# Altium PCB Master-PCB.PcbDoc (part 3 of 3)
Units mil, origin at the board's own origin, x right, y up, seen from the top; angles counter-clockwise.
Board outline 3149.61 x 2348 mil, 2 copper layers (Top Layer, Bottom Layer), stack 57 mil thick; 132 components, 59 nets, 410 pads, 547 vias.
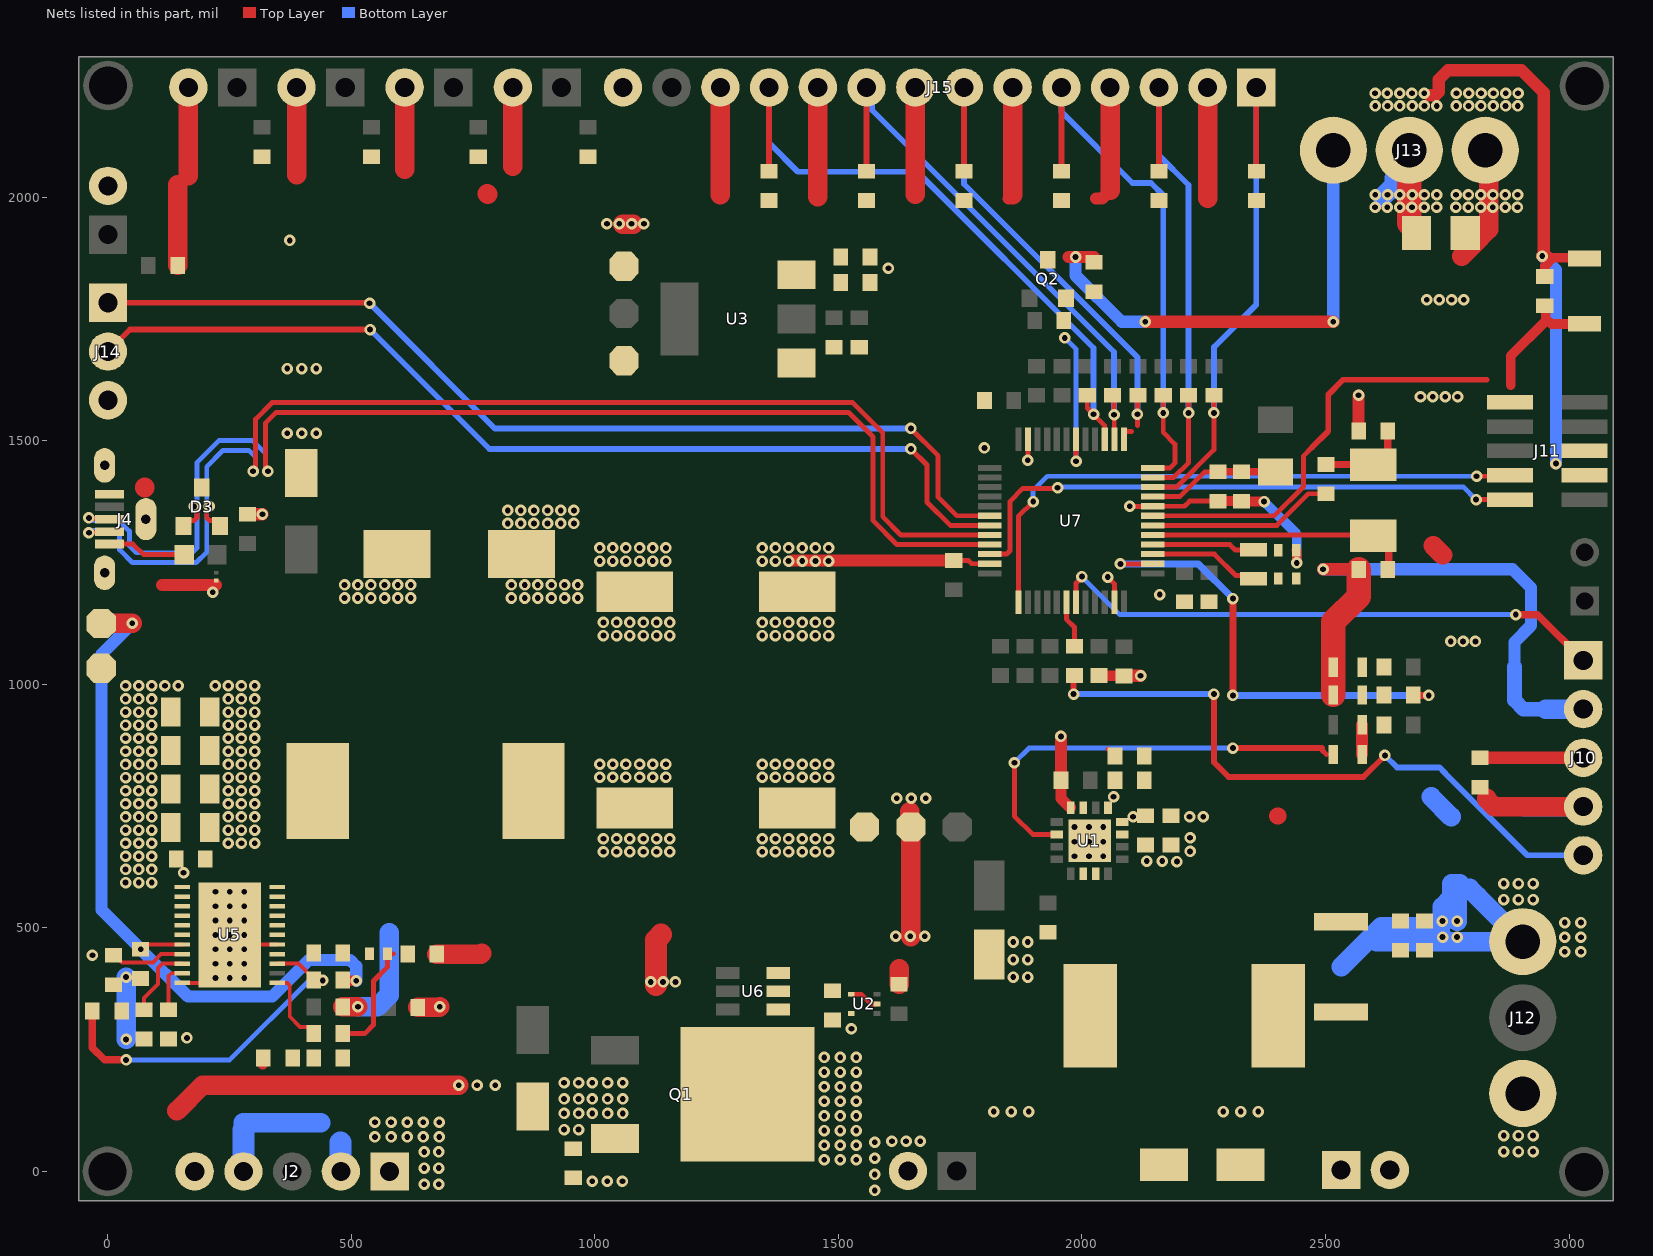
[diagram p2: the nets of this part, all layers, seen from the top]

## Via types
v1: diameter 23.62, hole 11.81, Top Layer to Bottom Layer, 545 vias
v2: diameter 23.62, hole 11.81, Top Layer to Bottom Layer, tented both sides, 2 vias

## Nets (pads, with @x,y where several pads share a name; then routed paths per layer and width w, separated by ;. In a path a pad name is that pad's centre, name@x,y a point inside that pad or via, vN(x,y) a via of type N, cw(c..) or ccw(c..) an arc to the next point about the centre after c; other vN are vias at no path point) (continued)
GND: C1.2 C2.1 C3.1 C4.1 C5.1 C6.1 C7.1 C8.1 C9.1 C10.1 C11.1 C12.1 C13.1 C14.1 C15.1 C16.1 C17.1 C18.1 C19.1 C20.1 C21.1 C22.1 C23.2 C24.2 C25.1 C26.1 C27.1 C28.1 C29.1 C30.2 C31.1 C32.2 C33.1 C36.2 C37.2 C38.1 C40.1 C41.1 C42.1 C43.1 C44.1 C45.1 C46.1 C47.1 C48.1 C49.2 C50.2 C51.2 C52.2 C53.2 C54.2 D1.2 D3.3 D4.2 J1.2 J2.5 J3.2 J4.5 J4.SH1 J4.SH2 J4.SH3 J5.2 J6.2 J7.2 J8.2 J9.2 J10.2 J11.3 J11.5 J12.1 J13.2 J14.3 J15.2 J15.4 J15.6 J15.8 J15.10 J15.12 LED3.2 LED4.2 P9.1 R9.2 R14.1 R17.1 R19.2 R31.1 SW1.2 U1.7 U1.11 U1.12 U1.17 U2.2 U2.4 U3.1 U5. U5.5 U5.22 U5.23 U6.2 U6.3 U7.8 U7.23 U7.35 U7.47 | length 7375.2
  Top Layer w8: U5.22@153.56,387.1 U5.23@207.94,387.1 ; U5.23@294.06,465.84 U5.5@348.44,465.84
  Top Layer w10: U5.23@272.53,454.93 276.21,454.93 U5.23@286.06,464.77 ; U2.4@1526.43,363.68 1547.32,363.68 1567,344 U2.2@1579.57,344 ; C16.1@1726,1254 C16.1@1737,1254 1767,1254 1773.58,1247.42 U7.35@1810.68,1247.42 ; v1(1889,1460) 1889.21,1460.21 1889.21,1503.11 U7.23@1889.42,1503.32 ; v1(2053,1220) 2066.79,1206.21 2066.79,1168.89 U7.47@2066.58,1168.68 ; v1(2098.26,1365.26) 2145.06,1365.26 U7.8@2145.32,1365.53 2210.53,1365.53 2221,1376 C14.1@2279,1376 ; C21.1@2328,1376 C21.1@2329,1375
  Top Layer w20: C14.1@2279,1376 C21.1@2328,1376 ; C21.1@2329,1375 v1(2374,1375) v1@2374.69,1375 ; C13.1@2440,1275 2441,1274 v1(2441,1249) ; v1(2945,1879) 2957,1879 2960.28,1875.72 3032,1875.72 3033.86,1873.86 SW1.2@3032,1873.86 ; C22.1@2950,1837 2950,1859 2965,1874 ; v1(2973,1453) v1@2974,1453 ; SW1.2@3006.07,1874 SW1.2@3031.86,1874
  Top Layer w22: R14.1@318,221 R14.1@318.69,220.31 ; C5.1@1957,803 1957,765.53 1975.63,746.89 U1.12@1976.96,746.89 ; R9.2@2035.4,1018 2035.9,1017.5 2085.5,1017.5 C15.1@2086,1017
  Top Layer w25: 112,1204 223,1204 ; C42.1@287,1349 v1(318,1349) ; 388,2046 390,2044 ; 610,2057 612,2055 ; 1254,2001 1258,2005 ; v1@1406.86,1254 C16.1@1726,1254 ; 1457,2000 1458,2001 ; 1850,1997 1858,2005 ; C5.1@1957,803 v1(1957,893) ; 2029,1997 2041.5,1997 2058,2013.5 ; C15.1@2086.37,1017.37 v1(2120.37,1017.37) ; C19.1@2210.77,1168.77 C19.1@2211,1169 ; 2258,1998 2259,1997 ; v1(2495,1236) C23.2@2568,1236 ; C24.2@2568,1520 v1(2568,1593) ; 2714,2209 2726,2209 2732.5,2215.5 2732.5,2241.5 2751.35,2260.35 2902.23,2260.35 2948,2214.58 2948,1882 v1(2945,1879)
  Top Layer w40: 76,1404 76.26,1403.74 ; 142.5,124.5 195,177 v1(721,177) ; C47.1@144,1860 144,2025 ; 166,2044 J8.2@166,2225 J8.2@166,2227 ; 388,2046 J7.2@388,2225 J7.2@388,2227 ; 610,2057 J6.2@610,2225 J6.2@610,2227 ; R31.1@637,337 681,337 v1(682,338) ; 779,2007 780,2006 ; 832,2063.35 J5.2@832,2225 J5.2@832,2227 ; 1258,2005 J15.12@1258,2225 ; 1458,2001 J15.10@1458,2225 ; C41.1@1625,384 1625,416 ; 1658,2006 J15.8@1658,2225 ; 1858,2005 J15.6@1858,2225 ; 2058,2013.5 J15.4@2058,2225 ; 2258,1998 J15.2@2258,2225
  Top Layer w50: LED4.2@2516,978 LED3.2@2516,1035 2516,1128 2568,1180 C23.2@2568,1236 ; J13.2@2672,2096 2672,1946 2687,1931 C38.1@2687,1926
  Bottom Layer w20: v1@2374.69,1374.31 2441,1308 v1(2441,1249)
  Bottom Layer w25: v1(2495,1236) 2884,1236 2922,1198 2922,1120.4 2888,1086.4 2888,1036 ; v1(2945,1879) 2973,1851 v1(2973,1453)
  Bottom Layer w30: 2888,1036 2888,967 2906,949 2952,949
  Bottom Layer w40: v1(38,271) v1(38,399) ; v1@2617,2000 2641.36,2024.36 2641.36,2038.89 2672,2069.54 J13.2@2672,2096 ; 2952,949 J10.2@3029,949
  other v1: 1575,-39 995,-20 1026,-20 1057,-20 1575,-6 1575,27 2866,40.81 2896,40.81 2926,40.81 1575,60 1610,62 1639,62 1668,62 2866,73.81 2896,73.81 2926,73.81 1819,123 1855,123 1891,123 2290,123 2326,123 2362,123 758.5,177 796,177 163,274 1859,399 1889,399 1859,435 1889,435 1859,471 1889,471 2195,636 2133,637 2165,637 1985,647 2014.5,647 2044,647 1344,656.07 1371,656.07 1398,656.07 1426,656.07 1453,656.07 1480,656.07 2222,657 248,673.79 275,673.79 302,673.79 1985,677 2014.5,677 2044,677 1344,683 1371,683 1398,683 1426,683 1453,683 1480,683 2222,685 248,700.71 275,700.71 302,700.71 1985,707 2014.5,707 2044,707 248,727.64 275,727.64 302,727.64 248,754.57 275,754.57 302,754.57 248,781.5 275,781.5 302,781.5 248,808.43 275,808.43 302,808.43 1344,809 1371,809 1398,809 1426,809 1453,809 1480,809 248,835.36 275,835.36 302,835.36 1344,835.93 1371,835.93 1398,835.93 1426,835.93 1453,835.93 1480,835.93 248,862.28 275,862.28 302,862.28 248,889.21 275,889.21 302,889.21 248,916.14 275,916.14 302,916.14 248,943.07 275,943.07 302,943.07 248,970 275,970 302,970 221,996.93 248,996.93 275,996.93 302,996.93 1344,1100.07 1371,1100.07 1398,1100.07 1426,1100.07 1453,1100.07 1480,1100.07 1344,1127 1371,1127 1398,1127 1426,1127 1453,1127 1480,1127 486.67,1177.07 513.67,1177.07 540.67,1177.07 568.67,1177.07 595.67,1177.07 622.67,1177.07 2160,1184 216,1188.93 486.67,1204 513.67,1204 540.67,1204 568.67,1204 595.67,1204 622.67,1204 1344,1253 1371,1253 1398,1253 1426,1253 1453,1253 1480,1253 1344,1279.93 1371,1279.93 1398,1279.93 1426,1279.93 1453,1279.93 1480,1279.93 1800,1485 1603,1854 374,1911 2601.67,1979 2626.93,1979 2652.2,1979 2677.47,1979 2702.73,1979 2728,1979 2602.09,2005 2627.36,2005 2652.63,2005 2677.89,2005 2703.16,2005 2728.43,2005 2602.09,2187 2627.36,2187 2652.63,2187 2677.89,2187 2703.16,2187 2728.43,2187 2601.67,2213 2626.93,2213 2652.2,2213 2677.47,2213 2702.73,2213
HV_LED_DATA: J13.3 Q2.3 R8.1 | length 1011.1
  Top Layer w25: 1972.5,1877 v1(1986.9,1877) R8.1@2025,1877 ; v1(2130.24,1744) v1(2516.09,1744)
  Bottom Layer w25: v1(1986.9,1877) 1986.9,1838.82 2081.72,1744 v1(2130.24,1744) ; v1(2516.09,1744) J13.3@2516.09,2096
I/O1: C49.1 J15.1 R15.2 U7.10 | length 1148.2
  Top Layer w10: U7.10@2145.32,1404.9 2194.9,1404.9 2271,1481 R15.2@2271,1592
  Top Layer w12: C49.1@2358,2049 J15.1@2358,2225
  Bottom Layer w12: v1(2271,1557) 2271,1692 2358,1779 J15.1@2358,2225
I/O2: C50.1 J15.3 R16.2 U7.11 | length 1080.5
  Top Layer w10: U7.11@2145.32,1424.58 2188.58,1424.58 2219,1455 v1(2219,1557) R16.2@2219,1584
  Top Layer w12: C50.1@2158,2053 J15.3@2158,2225
  Bottom Layer w12: J15.3@2158,2225 2158,2086 2219,2025 v1(2219,1557)
I/O3: C51.1 J15.5 R25.2 U7.12 | length 1146.5
  Top Layer w10: U7.12@2145.32,1444.27 2181.27,1444.27 2191,1454 2191,1493 2167,1517 v1(2167,1557) R25.2@2167,1592
  Top Layer w12: C51.1@1958,2053 J15.5@1958,2225
  Bottom Layer w12: J15.5@1958,2225 1958,2175 2104,2029 2142,2029 2167,2004 v1(2167,1557)
I/O4: C52.1 J15.7 R27.2 U7.13 | length 1082.9
  Top Layer w10: U7.13@2086.27,1503.32 2086.27,1517.46 2087.57,1518.76 2101.71,1518.76 ; 2114,1531.05 v1(2114,1554) 2114,1592 R27.2@2115,1593
  Top Layer w12: C52.1@1758,2053 J15.7@1758,2225
  Bottom Layer w12: J15.7@1758,2225 1758,2027 2114,1671 v1(2114,1554)
I/O5: C53.1 J15.9 R28.2 U7.14 | length 1145.6
  Top Layer w10: R28.2@2063,1593 2066,1590 v1(2066,1553) 2066.29,1552.71 2066.29,1503.61 U7.14@2066.58,1503.32
  Top Layer w12: C53.1@1558,2053 J15.9@1558,2225
  Bottom Layer w12: J15.9@1558,2225 1569.07,2213.93 1569.07,2178.93 2066,1682 v1(2066,1553)
I/O6: C54.1 J15.11 R29.2 U7.15 | length 1355.1
  Top Layer w10: R29.2@2011,1593 2011,1567 2047,1531 U7.15@2047,1517 ; U7.15@2045.6,1504.62 U7.15@2046.9,1503.32
  Top Layer w12: C54.1@1358,2053 J15.11@1358,2225
  Bottom Layer w12: J15.11@1358,2225 1358,2111 1417,2052 1662,2052 2024,1690 v1(2024,1554)
LATCH: J10.1 U7.43 | length 1157.6
  Top Layer w10: U7.43@1987.84,1168.68 1987.84,1207.69 2000,1219.85 v1(2000,1221)
  Top Layer w15: v1(2890.69,1143) 2935,1143 J10.1@3029,1049
  Bottom Layer w10: v1(2000,1221) 2078,1143 v1(2890.69,1143)
LED_DATA: Q2.2 R7.1 U7.18 | length 307.9
  Top Layer w10: U7.18@1987.84,1503.32 1987.84,1458.16 v1(1988,1458)
  Bottom Layer w10: v1(1965,1711) 1988,1688 v1(1988,1458)
LED_LAT: J10.5 R26.1 | length 1340.5
  Top Layer w10: R26.1@1983,1016.2 R26.1@1984.8,1018
  Top Layer w12: v1(1983,980) R26.1@1983,1016.2 ; v1(2271,980) 2271,840 2301,810 2578,810 v1(2622,854)
  Bottom Layer w12: v1(1983,980) v1(2271,980) ; v1(2622,854) 2647,829 2734.27,829 2745,818.27 2745,818 2914,649 J10.5@3029,649
LL: C34.1 L2.1 R3.1 U5.6 U5.7 U5.8 U5.9 U5.10 U5.11
LX: D1.1 L1.1 U1.2 U1.3
MCU_SWCLK: J11.4 U7.37 | length 1233.2
  Top Layer w10: U7.37@1869.73,1168.68 1869.73,1344.73 v1(1900,1375) ; v2(2810,1427) 2876.46,1427 J11.4@2878.46,1429
  Bottom Layer w10: v1(1900,1375) 1900,1398 1929,1427 v2(2810,1427)
MCU_SWDIO: J11.2 U7.34 | length 1194.5
  Top Layer w10: U7.34@1810.68,1267.1 1845.18,1267.1 1852.73,1274.66 1852.73,1375.73 1879,1402 1948.81,1402 v1(1950,1403.19) ; v2(2809,1379) J11.2@2878.46,1379
  Bottom Layer w10: v1(1950,1403.19) 1951.42,1404.61 2783.39,1404.61 v2(2809,1379)
MODE: R17.2 R18.1 U5.20 | length 167.7
  Top Layer w8: R17.2@75,332 75,356 104,385 104,418 112.47,426.47 U5.20@153.56,426.47
  Top Layer w10: R17.2@75,332 77.5,332 R17.2@87.5,342
NetC13_2: C13.2 U7.4 X1.1 | length 211.5
  Top Layer w10: U7.4@2145.32,1286.79 2303.66,1286.79 2315.22,1275.22 X1.1@2352,1275.22
NetC14_2: C14.2 C21.2 FB1.2 U7.9 | length 272.7
  Top Layer w10: U7.9@2145.32,1385.21 2201.21,1385.21 2252,1436 C14.2@2279,1436
  Top Layer w15: C14.2@2279,1436 C21.2@2328,1436 FB1.2@2397,1436
NetC18_2: C18.2 U7.3 X1.2 | length 227.5
  Top Layer w10: U7.3@2145.32,1267.1 2271.9,1267.1 2315.75,1223.25 2345.7,1223.25 X1.2@2352,1216.94
NetC23_1: C23.1 U7.5 X2.2 | length 502.3
  Top Layer w10: U7.5@2145.32,1306.47 2596.53,1306.47 X2.2@2598,1305
  Top Layer w15: C23.1@2630,1236 X2.2@2630,1285
NetC24_1: C24.1 R30.2 X2.1 | length 180.2
  Top Layer w12: X2.1@2598,1450.67 2600.54,1450.67 X2.1@2628,1478.13
  Top Layer w15: R30.2@2501,1451 X2.1@2598,1451 ; X2.1@2628,1478.13 C24.1@2628,1520
NetC34_2: C34.2 U5.4
NetC35_2: C35.2 C55.1 R3.2 | length 240.5
  Top Layer w10: C55.1@483,283 528,283 546,301 546,391 574.5,419.5 R3.2@574.5,447 ; R3.2@577.5,440.5 584,447 587,447
NetF1_1: F1.1 J4.1 | length 162.6
  Top Layer w10: J4.1@4,1287.82 52.18,1287.82 74,1266 F1.1@157.54,1266
NetJ10_3: J10.3 R5.1 | length 212
  Top Layer w25: R5.1@2817,849 J10.3@3029,849
NetLED1_1: LED1.1 LED2.1 R2.2 | length 62.4
  Top Layer w20: LED1.1@2575.06,917 LED1.1@2575.21,916.84 ; R2.2@2619.16,916.84 R2.2@2620,916
  Top Layer w25: LED2.1@2575.06,856 LED1.1@2575.06,917
NetLED3_1: LED3.1 R6.1
NetLED4_1: LED4.1 R10.1
NetR19_1: R19.1 U5.21 | length 99.9
  Top Layer w8: R19.1@125,332 125,400.93 130.86,406.79 U5.21@153.56,406.79
NetR30_1: R30.1 U7.6 | length 382.5
  Top Layer w10: U7.6@2145.32,1326.16 2400.16,1326.16 2465,1391 R30.1@2501,1391
NRST: C22.2 J11.10 SW1.1 U7.7 | length 1156.5
  Top Layer w10: U7.7@2145.32,1345.84 2394.84,1345.84 2455,1406 2455,1469 2472,1486
  Top Layer w12: 2472,1486 2505.5,1519.5 2505.5,1594.5 2536,1625 2831,1625
  Top Layer w20: J11.10@2878.46,1579 J11.10@2880.26,1580.8 ; 2880,1614 2880,1674 2950,1744 ; C22.2@2950,1777 2952,1775 2952,1751 2963.72,1739.28 3029.29,1739.28 3030.29,1738.29 SW1.1@3032,1740
PB6: R26.2 U7.42 | length 97.6
  Top Layer w10: U7.42@1968.16,1168.68 1968.16,1133.84 1984.8,1117.2 R26.2@1984.8,1078
PGOOD: R12.2 R18.2 U5.3 | length 735.2
  Top Layer w8: U5.3@348.44,426.47 392.03,426.47 R12.2@423,395.5
  Top Layer w10: R12.2@423,393 R12.2@423,395.5
  Top Layer w15: R18.2@-31,329 -31,254 -6,229 v1(38,229)
  Top Layer w22: R12.2@423,393 423.69,392.31 441.69,392.31 v1(442,392)
  Bottom Layer w10: v1(38,229) 251,229 414,392 v1(442,392)
RX: J14.2 U7.31 | length 2039.3
  Top Layer w10: v1(1649,1483) 1682,1450 1682,1374 1729.84,1326.16 U7.31@1810.68,1326.16
  Top Layer w12: J14.2@1,1683 46,1728 v1(539,1728)
  Bottom Layer w12: v1(539,1728) 784,1483 v1(1649,1483)
S\T\D\B\Y\: LED2.2 U1.14 | length 868.8
  Top Layer w10: v1(1861.5,839) 1861.5,729.5 1899.22,691.78 U1.14@1948.09,691.78 ; 2492.76,865 2502.26,855.5
  Top Layer w12: v1(2310,869) 2492.76,869
  Bottom Layer w10: v1(1861.5,839) 1891.5,869 v1(2310,869)
TEST: R10.2 U7.2 | length 960.3
  Top Layer w10: v1(2079,1247) 2079.21,1247.21 2145.11,1247.21 U7.2@2145.32,1247.42 ; R10.2@2680,978 R10.2@2681,977
  Top Layer w15: v1(2310,977) v1(2310,1176) ; R10.2@2681,977 v1(2712,977)
  Bottom Layer w15: v1(2079,1247) 2239,1247 v1(2310,1176) ; v1(2310,977) v1(2712,977)
TX: J14.1 U7.30 | length 2040.5
  Top Layer w10: v1(1649,1525) 1705,1469 1705,1384 1743.16,1345.84 U7.30@1810.68,1345.84
  Top Layer w12: J14.1@1,1783 537,1783 v1(538,1782)
  Bottom Layer w12: v1(538,1782) 795,1525 v1(1649,1525)
USB_D_N: D3.2 J4.2 U7.32 | length 2575.1
  Top Layer w10: v1(-38,1310.89) -36.74,1312.15 2.74,1312.15 J4.2@4,1313.41 ; v1(208.91,1365) 203.6,1359.69 203.6,1341.85 209.46,1335.99 220.01,1335.99 D3.2@231,1325 ; v1(298.69,1437) 298.69,1440.69 304,1446 304,1544.28 337.72,1578 1529.28,1578 1591.21,1516.07 1591.21,1343.86 1628.6,1306.47 U7.32@1810.68,1306.47
  Bottom Layer w10: v1(-38,1310.89) -34.31,1310.89 -29,1316.2 15,1316.2 25,1306.2 25,1275.72 50.72,1250 182.28,1250 203.6,1271.31 203.6,1356 208.91,1361.31 v1(208.91,1365) 208.91,1368.69 203.6,1374 203.6,1446.6 237,1480 290,1480 304,1466 304,1445 298.69,1439.69 v1(298.69,1437)
USB_D_P: D3.1 J4.3 U7.33 | length 2574.6
  Top Layer w10: v1(-38,1341.52) -36.74,1340.26 2.74,1340.26 J4.3@4,1339 ; D3.1@156.2,1325 167.19,1335.99 177.74,1335.99 183.6,1341.85 183.6,1359.62 v1(178.29,1364.93) ; v1(329.31,1437) 329.31,1440.69 324,1446 324,1536 346,1558 1521,1558 1571.21,1507.79 1571.21,1343.86 1571.53,1343.54 1571.53,1335.7 1620.44,1286.79 U7.33@1810.68,1286.79
  Bottom Layer w10: v1(-38,1341.52) -34.31,1341.52 -29,1336.2 23.28,1336.2 45,1314.49 45,1284 59,1270 174,1270 183.6,1279.6 183.6,1355.93 178.29,1361.24 v1(178.29,1364.93) 178.29,1368.62 183.6,1373.93 183.6,1454.88 228.72,1500 298.28,1500 324,1474.28 324,1445 329.31,1439.69 v1(329.31,1437)
VBAT: C6.2 C7.2 C8.2 C31.2 C40.2 J3.1 J12.3 P2.1 Q1.3 R1.2 U1.9 U2.5 U6.1 | length 1196.4
  Top Layer w10: C7.2@2053.74,866.74 C7.2@2054,867
  Top Layer w40: 1647,738 1647,709 P2.1@1649,707 v1@1649,482
  Bottom Layer w40: 2532,420 2594.31,482.31 2614,502 2736.5,502 ; 2604.81,471.81 v1@2740.4,471.81 ; 2717,769 2758,728 ; v1(2740,514) 2740,543 2759,562 2759,591 2776,591 ; v1(2740.4,481.22) v1@2740.4,471.81 ; v1(2770,514) 2770,591 ; 2795.91,580.91 2812.41,564.41 J12.3@2905,471.81 2770,471.81 v1@2740.4,471.81
  other v1: 1471,24 1504,24 1537,24 1471,54 1504,54 1537,54 1471,84 1504,84 1537,84 1471,114 1504,114 1537,114 1471,144 1504,144 1537,144 1471,174 1504,174 1537,174 1471,204 1504,204 1537,204 1471,234 1504,234 1537,234 1527,293 2991.19,450.81 3024.19,450.81 2770,481 2991.19,480.81 3024.19,480.81 1618,483 1647.83,483 1677.67,483 2991.19,510.81 3024.19,510.81 2866,558 2896,558 2926,558 2866,591 2896,591 2926,591 1620,766 1649.83,766 1679.67,766 2065,769
VCC: C25.2 C26.2 C27.2 C28.2 C29.2 C33.2 J2.2 J2.4 P5.1 R11.1 U5.12 U5.13 U5.14 U5.15 U5.16 U5.17 U5.19 | length 712.4
  Top Layer w8: C33.2@12.5,443.5 15,443.5 29.5,429 93,429 110.16,446.16 U5.19@153.56,446.16
  Top Layer w40: R11.1@483,338 v1(514,338)
  Bottom Layer w40: 279,85 294,100 ; 279,100 294,100 ; 438,100 294,100 ; J2.2@478.23,0.77 J2.2@479,0 ; v1(514,338) 553.85,338 577.93,362.07 577.93,490.15
  Bottom Layer w45: J2.4@279,0 279,85 ; J2.2@478.23,0.77 478.23,59.77
  other v1: -31,444 37,593 64,593 91,593 156,613 37,619.93 64,619.93 91,619.93 37,646.86 64,646.86 91,646.86 37,673.79 64,673.79 91,673.79 37,700.71 64,700.71 91,700.71 37,727.64 64,727.64 91,727.64 37,754.57 64,754.57 91,754.57 37,781.5 64,781.5 91,781.5 37,808.43 64,808.43 91,808.43 37,835.36 64,835.36 91,835.36 37,862.28 64,862.28 91,862.28 37,889.21 64,889.21 91,889.21 37,916.14 64,916.14 91,916.14 37,943.07 64,943.07 91,943.07 37,970 64,970 91,970 37,996.93 64,996.93 91,996.93 118,996.93 145,996.93
VCC#: C48.2 D2.1 J2.1 P4.1 Q1.2 | length 107.3
  Top Layer w45: 1126,383 1126,475.5 1136.5,486
  other v1: 650,-26 680,-26 650,7 680,7 650,40 680,40 549,71 582,71 615,71 648,71 681,71 937,86 967,86 549,101 582,101 615,101 648,101 681,101 937,119 967,119 995,119 1026.33,119 1057.67,119 937,149 967,149 995,149 1026.33,149 1057.67,149 937,182 967,182 995,182 1026.33,182 1057.67,182 1115,389 1140.33,389 1165.67,389
VCC_5V: C9.2 C10.2 C30.1 C35.1 C36.1 C37.1 C38.2 D5.1 J10.4 J13.1 J15.14 L2.2 P8.1 R5.2 R8.2 R13.1 U3.3 | length 756.3
  Top Layer w40: D5.1@397,1432.74 D5.1@398,1433.74 ; C35.1@676,446 766,446 768,448 ; v1@1058,1944 v1@1079,1944 ; 2720.97,1284.84 2740.47,1265.34 ; 2780,1879 2834.91,1933.91 ; C38.2@2804.5,1903.5 2834.91,1933.91 ; 2831,766.5 2831,764 2846,749 J10.4@3029,749 ; J13.1@2834.91,2099 2834.91,1933.91
  Bottom Layer w40: 2908,749 J10.4@3029,749
  other v1: 1018,656.07 1045,656.07 1072,656.07 1100,656.07 1127,656.07 1154,656.07 1018,683 1045,683 1072,683 1100,683 1127,683 1154,683 1010.14,809 1037.14,809 1064.14,809 1092.14,809 1119.14,809 1146.14,809 1010.14,835.93 1037.14,835.93 1064.14,835.93 1092.14,835.93 1119.14,835.93 1146.14,835.93 2757,1088 2782.33,1088 2807.67,1088 1018,1100.07 1045,1100.07 1072,1100.07 1100,1100.07 1127,1100.07 1154,1100.07 1018,1127 1045,1127 1072,1127 1100,1127 1127,1127 1154,1127 829.19,1177.07 856.19,1177.07 883.19,1177.07 911.19,1177.07 938.19,1177.07 965.19,1177.07 829.19,1204 856.19,1204 883.19,1204 911.19,1204 938.19,1204 965.19,1204 1010.14,1253 1037.14,1253 1064.14,1253 1092.14,1253 1119.14,1253 1146.14,1253 1010.14,1279.93 1037.14,1279.93 1064.14,1279.93 1092.14,1279.93 1119.14,1279.93 1146.14,1279.93 821.33,1330 848.33,1330 875.33,1330 903.33,1330 930.33,1330 957.33,1330 821.33,1356.93 848.33,1356.93 875.33,1356.93 903.33,1356.93 930.33,1356.93 957.33,1356.93 369,1515 398.83,1515 428.67,1515 2695,1590 2720.33,1590 2745.67,1590 2771,1590 369,1648 398.83,1648 428.67,1648 2708,1789 2733.33,1789 2758.67,1789 2784,1789 1025,1945 1050.33,1945 1075.67,1945 1101,1945 2767.67,1979 2792.93,1979 2818.2,1979 2843.47,1979 2868.73,1979 2894,1979 2768,2005 2793.27,2005 2818.53,2005 2843.8,2005 2869.07,2005 2894.33,2005 2768.48,2187 2793.74,2187 2819.01,2187 2844.28,2187 2869.54,2187 2894.81,2187 2768.81,2213 2794.08,2213 2819.34,2213 2844.61,2213 2869.88,2213 2895.14,2213
VFB: C55.2 R13.2 R14.2 U5.1 | length 156.7
  Top Layer w8: U5.1@348.44,387.1 348.81,386.73 369.31,386.73 374,382.04 374,318 395.5,296.5 412,296.5 423,285.5 C55.2@423,283
VREG: C32.1 P7.1 R12.1 U5.18 | length 1455.3
  Top Layer w8: C32.1@68,465.84 U5.18@153.56,465.84
  Top Layer w22: R12.1@483,393 484.69,391.31 v1(510.69,391.31)
  Top Layer w40: P7.1@-13,1125 v1(51,1125)
  Bottom Layer w22: v1@68,456.44 v1(68,456) v1@68.31,455.69
  Bottom Layer w25: v1(51,1125) -12,1062 -12,536.44 v1@68,456.44 ; v1@68.31,455.69 165,359 338,359 413,434 497.8,434 510.69,421.11 v1(510.69,391.31)
VS: C3.2 C4.2 L1.2 R1.1 U1.8 | length 1.2
  Top Layer w35: 2402,730 2402.83,729.17
  other v1: 2105,727.99 2221,728 2249,728
pads on no net: J2.3 J4.4 J11.6 J11.7 J11.8 J11.9 J12.2 U1.6 U2.3 U6.4 U7.16 U7.17 U7.21 U7.22 U7.25 U7.26 U7.27 U7.28 U7.29 U7.38 U7.45 U7.46

## Polygon pours and split planes (outlines as drawn)
GND on Top Layer "GND_L01_P000" (solid, remove dead copper, pour order 0): 41,34 2992,34 2992,2188 41,2188
GND on Bottom Layer "GND_L02_P001" (solid, remove dead copper, pour order 1): 41,34 2992,34 2992,2188 41,2188

## Other copper
Top Layer:
  rectangle net VCC_5V: 469,205 805,255
  rectangle net GND: 935,-32 987,5
  rectangle net VBAT: 1325,5 1547,346
  rectangle net VBAT: 1175,5 1499,296
  region net VCC_5V: 2179,1929.84 2060,1929.84 2060,1832.69 2179,1832.69
  rectangle net GND: 2189,1887 2671.41,2016
  region net VCC: 170,481 170,1071 -49,1071 -49,481
  region net GND: 96,1124 143,1171 45,1269 -2,1222
  rectangle net GND: 95,1124 198,1217
  rectangle net GND: -39,1181.52 46,1269
  region net NetC34_2: 331,454.3 331,438 423,438 423,454.3
  region net VS: 2448.88,212 2448.88,749 2311,749 2311,212
  region net GND: 1560,76 1560,-53.72 1684,-53.72 1684,76
  rectangle net 12V: 850,311 1298.54,346
  rectangle net NRST: 2925.01,1718.01 3067,1792.01
  region net GND: 2928,1921 2928,1813.85 3069,1813.85 3069,1921
  region net VBAT: 3041,534.15 2938.85,534.15 2938.85,401 3041,401
  rectangle net GND: 2595,1887 2745,2228
  rectangle net VFB: 405,209 442,305
  region net NetC35_2: 565,465 565,428 632,428 632,465
  rectangle net LL: 461,428 553,886
  rectangle net LX: 1999,57 2116,544
  region net VCC#: 1184,353 1184,516.24 1095,516.24 1095,353
  region net VCC#: 1594,453 1594,748 1515,748 1515,453
  rectangle net VCC#: 1095,450 1594,519
  rectangle net VBAT: 1606,461 1692,790
  region net GND: 1912,83 1912,163 1560,163 1560,83
  region net 12V: 1702,76 1702,-53.72 1861,-53.72 1861,76
  rectangle net GND: 1305,532 1498,1522
  rectangle net GND: 1550,1802 1616,1896
  rectangle net I/O4: 2080,1476 2121,1531
  region net NetC23_1: 2645,1312 2612,1312 2612,1215 2645,1215
  rectangle net NetC24_1: 2613,1444 2646,1541
  rectangle net VCC_5V: 2006,1771 2239,1840
  rectangle net NRST: 2821,1561 2944,1635
  rectangle net VCC_5V: 2794,703 3083,797.32
  rectangle net VCC_5V: 2681,1069 2826.78,1337
  rectangle net VCC_5V: 2681.47,1073 2783,1609
  region net VCC_5V: 2906,1771 2906,1877.85 2167,1877.85 2167,1771
  rectangle net VCC_5V: 2753,1833 2905,2230
  region net VCC_5V: 987,1595 987,1702 354,1702 354,1595
  rectangle net VCC_5V: 857,1597 988,1967
  rectangle net VCC_5V: 351,1366 448,1536
  rectangle net GND: 1022,1644 1102,1705
  rectangle net GND: 1022,1612 1662,1663
  rectangle net 3V3: 1194,1675 1342,1825
  rectangle net VCC_5V: 973,1817 1103.53,1864
  rectangle net 3V3: 1020,1720 1212,1802
  rectangle net VCC_5V: 1514,1903.05 2179,1966
  rectangle net VCC_5V: 887,1836 1385,1966
  region net GND: 711,197 711,157 825,157 825,197
  rectangle net S\T\D\B\Y\: 2476,832 2528.53,879
  rectangle net C\R\H\G\: 2476,893 2528.53,940
  rectangle net NetLED4_1: 2562,954 2635,1000
  rectangle net NetLED3_1: 2562,1011 2635,1056
  rectangle net GND: 113,1385 214,1423
  rectangle net BUCK_EN: 1604,324 1643,345
  rectangle net GND: 1372,1612 1822,1710
  rectangle net 3V3: 1133,1720 1853,1791
  rectangle net VCC_5V: 1374,1805 1524,1966
  region net GND: 1822,1635 1774,1635 1774,1463 1822,1463
  rectangle net GND: 466,1391 1497.69,1535
  rectangle net VCC_5V: 723,532 1184,1372
  rectangle net 12V: 1706,624 1782,738
  rectangle net GND: 466,1153 636,1512
  rectangle net GND: 263,1053 636,1217
  rectangle net 12V: 2655,663 2733,939.24
  rectangle net 12V: 838,217 955,451
  rectangle net LX: 1960,-36 2220,61
  rectangle net LX: 1961,-25 2075,427
  rectangle net GND: 2273,57 2662,143
  rectangle net LL: 332,480 550,886
  rectangle net GND: 186,377 313,1217
  rectangle net 3V3: 2068,1062 2136,1095
  rectangle net GND: 48,1300 123,1389
  rectangle net 5V_USB: 261,1225 451.45,1326
  rectangle net 5V_USB: 203,1225 423,1299
  rectangle net VCC: 462,318 486,358
  rectangle net 3V3: 2194,1214 2277,1244
  rectangle net GND: 2145,1146 2282,1200
  rectangle net 3V3: 2654,1015 2682,1055
  rectangle net GND: 2956,1413 3080,1496
  rectangle net 12V: 2659,913 2699,935
  rectangle net GND: 2112,617 2240,701
  rectangle net NetLED1_1: 2560,895 2639,939
  rectangle net 3V3: 1713,987 1761.5,1222
  rectangle net 3V3: 1713,975 1952.47,1038
  rectangle net 3V3: 1829,1545 1879,1821
  region net GND: 164,1836 164,1870 124,1870 124,1836
  region net GND: 2154,998 2154,1037 2016,1037 2016,998
  region net VCC_5V: 724,561 724,205 826,205 826,561
  rectangle net GND: 59,-41 226,290
  rectangle net BUCK_EN: 1572,248 1643,331
  region net GND: 2429,106 2273,106 2273,-35 2429,-35
  rectangle net GND: 1352,377 1919,443
  rectangle net GND: 186,155 315,436
  region net GND: 20,292 20,252 210,252 210,292
  region net GND: 123,1381 123,1627 -43,1627 -43,1381
  rectangle net GND: 2593,-45 2669,69
  region net GND: 337.43,254 297.43,254 297.43,155 337.43,155
  rectangle net GND: 1605,363 1645,398
  rectangle net VCC: -49,425 39,493
  rectangle net VREG: 48,440 88,474
  rectangle net GND: 1560,-38 1684,137
  rectangle net GND: 935,-54 1684,-6
  rectangle net VCC#: 539,-45 881,149
  rectangle net GND: -50,1975 2440,2026
  rectangle net GND: -50,1979 1010,2099
  rectangle net VCC#: 836,21 1128,197
  rectangle net BUCK_EN: 398,316 438,361
  rectangle net PGOOD: 408,375 456,412
  rectangle net VFB: 360,209 440,251
  rectangle net MODE: 13,311 94,348
  rectangle net GND: -7,365 39,394
  rectangle net GND: -7,383 86,414
  rectangle net 3V3: 1868,1623 2422,1686
  region net GND: 2456,1204 2456,1294 2423,1294 2423,1204
  rectangle net 3V3: 1866,1637 1921,1821
  rectangle net HV_LED_DATA: 1912,1849 2049,1891
  rectangle net LED_DATA: 1945.84,1697 1992.84,1822
  rectangle net NetC18_2: 2324,1203 2414,1236
  rectangle net NetC13_2: 2324,1261 2414,1294
  rectangle net GND: 2638,-45 2968,229
  rectangle net GND: 2635,88 2724,472
  rectangle net VBAT: 2792,400 2979,494
  rectangle net VBAT: 2472,485 2979,610
  rectangle net VS: 2349,212 2617,428
  rectangle net 12V: 2045,561 2096,624
  rectangle net 12V: 2068,561 2103,649
  rectangle net GND: 1969,635 2011,761
  rectangle net GND: 2108,775 2154,1035
  rectangle net VBAT: 2044,734 2062,787
  rectangle net VBAT: 2044,756 2084,878
  rectangle net VS: 2069,709 2431,749
  rectangle net GND: 2048,683 2235,700
  rectangle net GND: 1707,436 1959,511
  rectangle net 12V: 1957,534 1985,624
  rectangle net 12V: 1706,534 1961,649
  rectangle net GND: 1352,355 1538,423
  rectangle net LX: 1994,-14 2036,624
  pour cut-out: 1958,560 1958,76 2463,76 2463,560 2462,560
  pour cut-out: 358,536.48 942,536.48 942,1029.52 358,1029.52
Bottom Layer:
  region net VCC#: 1112,17 1112,302 918,302 918,17
  region net VBAT: 1693,509 1490,509 1490,280 1693,280
  rectangle net VCC#: 1034,257 1181,404
  region net GND: 2542,2024 2542,1887 2695,1887 2695,2024
  region net VCC_5V: 2905,2231 2755.85,2231 2755.85,1573 2905,1573
  rectangle net VS: 2087,714 2262,742
  region net GND: 1560,78 1560,-53.72 1684,-53.72 1684,78
  rectangle net GND: 1314,645 1499,1409.88
  rectangle net GND: 462,1154 649,1226
  rectangle net VCC: 133.15,593.15 622,653
  rectangle net GND: 205,661 319,1013
  region net VCC: -49,463 -49,64 11,64 11,463
  rectangle net VCC: 14,544.58 172,1012
  region net VBAT: 1947,779 1602,779 1602,695 1947,695
  region net VBAT: 2717,810 2271,810 2271,732 2717,732
  region net VBAT: 2845,699 2730.5,813.5 2682.5,765.5 2797,651
  region net GND: 2242,706 2114,706 2114,622 2242,622
  rectangle net 12V: 848,526 2457,613.16
  rectangle net 12V: 1516,571 1956.04,661
  rectangle net 12V: 848,535.5 2106,625.5
  rectangle net 12V: 2269,569 2457,659
  rectangle net 12V: 2661.83,851 2734,945
  rectangle net GND: 1965,633 2061,723
  region net VCC: 635,313.15 635,654 533.85,654 533.85,313.15
  region net VCC: 501,147 -43,147 -43,64 501,64
  rectangle net VBAT: 2953,400 3043,536
  rectangle net VBAT: 2497,400 2976,603
  region net VCC_5V: 449,1687 352,1687 352,1293.23 449,1293.23
  region net GND: 1917,486 1805,486 1805,107 1917,107
  region net VBAT: 2732,812.88 1601,812.88 1601,749 2732,749
  region net VBAT: 2844.88,547 2844.88,698.5 2764,698.5 2764,547
  region net VBAT: 2774.88,597 2774.88,748.5 2707,748.5 2707,597
  region net VBAT: 1490,512 1490,436 1693,436 1693,512
  region net 12V: 1702,78 1702,-53.72 1861,-53.72 1861,78
  rectangle net 3V3: 2945,1113 3073,1216
  rectangle net VCC_5V: 2880.44,703 3074.68,799
  region net VCC_5V: 2949.5,772.5 2811.5,910.5 2742.4,841.4 2880.4,703.4
  region net VCC_5V: 2845,1105 2741.54,1105 2741.54,840.68 2845,840.68
  region net VCC_5V: 2783,1870 2681,1870 2681,1573 2783,1573
  region net GND: 2746.91,2228 2595.91,2228 2595.91,1887 2746.91,1887
  rectangle net VCC_5V: 349,1293 1171,1406
  rectangle net VCC_5V: 1011,1924 1110,2274
  rectangle net VCC_5V: 733,639 1186.26,1406
  region net VBAT: 2473,603 2473,-41 2578,-41 2578,603
  region net 12V: 955,559.24 848.28,559.24 848.28,399 955,399
  region net 12V: 2269,724 2269,614 2699,614 2699,724
  region net GND: 2376,163 1804,163 1804,88 2376,88
  rectangle net GND: 198.19,382.35 296.78,585.77
  rectangle net VBAT: 1458,7 1551,246
  rectangle net VCC#: 536,-45 696,125.74
  region net GND: 1684,-3 706,-3 706,-53.72 1684,-53.72
  region net GND: 826,-48 826,197 707,197 707,-48
  rectangle net 12V: 1701,-40 1796,637

## Silkscreen, mask and mechanical layers (free items; w line width, h text height)
Top Overlay:
  text "5V" at 1078.28,2104 h60 r90
  text "I/01" at 2382.28,2088 h60 r90
  text "I/06" at 1382.28,2084 h60 r90
  text "I/05" at 1582.28,2084 h60 r90
  text "I/04" at 1782.28,2084 h60 r90
  text "I/03" at 1979.28,2084 h60 r90
  text "I/02" at 2180.28,2084 h60 r90
  text "3V3" at 1179.28,2076 h60 r90
  text "GND" at 627.28,2057 h60 r90
  text "GND" at 854.28,2057 h60 r90
  text "GND" at 1280.28,2057 h60 r90
  text "GND" at 1480.28,2057 h60 r90
  text "GND" at 1680.28,2057 h60 r90
  text "GND" at 1880.28,2057 h60 r90
  text "GND" at 2080.28,2057 h60 r90
  text "GND" at 2280.28,2057 h60 r90
  text "GND" at 409.28,2055 h60 r90
  text "GND" at 183.28,2054 h60 r90
  text "#" at 302,2017.67 h60
  text "#" at 528,2017.67 h60
  text "#" at 747,2017.67 h60
  text "#" at 972,2017.67 h60
  text "BUTT1" at 948.28,2007 h60 r90
  text "BUTT3" at 503.28,2001 h60 r90
  text "BUTT2" at 722.28,2001 h60 r90
  text "BUTT4" at 277.28,2000.24 h60 r90
  text "GND" at 60,1997.72 h60
  text "#" at 1544,1930.67 h60
  text "#" at 1743,1930.67 h60
  text "#" at 1943,1930.67 h60
  text "#" at 2144,1930.67 h60
  text "#" at 2344,1930.67 h60
  text "#" at 1344,1929.67 h60
  text "BUTT5" at 60,1897.72 h60
  text "#" at 2936,1862.67 h60
  text "#" at 1627.33,1862 h60 r90
  text "#" at 208.33,1845 h60 r90
  text "5V" at 893.83,1833 h60
  text "DATA" at 2531,1809 h65 r90
  text "5V" at 2880.21,1806.5 h65 r90
  text "GND" at 2646.58,1805.05 h65 r90
  text "TX" at 58,1758 h60
  text "&" at 2007,1745 h60
  text "3V3" at 893.35,1735.95 h60
  text "&" at 1843,1727 h60
  text "&" at 1889,1677 h60
  text "&" at 1941,1677 h60
  text "&" at 1993,1677 h60
  text "&" at 2045,1677 h60
  text "&" at 2097,1677 h60
  text "&" at 2149,1677 h60
  text "&" at 2201,1677 h60
  text "&" at 2253,1677 h60
  text "RESET" at 2904.06,1670 h60
  text "RX" at 58,1658 h60
  text "#" at 1811,1648.33 h60 r180
  text "GND" at 898.95,1642.69 h60
  text "#" at 1477,1626.67 h60
  text "GND" at 58,1558.72 h60
  text "USB" at 84.5,1449 h60
  text "DEBUGGING" at 2825,1336.16 h60 r90
  text "#" at 297,1264.33 h60 r180
  text "#" at 1722,1129.67 h60
  text "BOOT" at 2981,1118 h60 r90
  text "#" at 2199,1106.67 h60
  text "VREG" at 31,1105.72 h60
  text "COM" at 2845.59,1019 h60
  text "VCC" at 31,1013.67 h60
  text "PWR" at 2311.95,1010 h60
  text "#" at 2102,992.33 h60 r180
  text "&" at 1815,954 h60
  text "&" at 1865.5,954 h60
  text "&" at 1916,954 h60
  text "TEST" at 2311.95,953 h60
  text "NO" at 2845.59,923 h60
  text "CHRG" at 2311.94,892 h60
  text "&" at 2799,869 h60
  text "STDBY" at 2284.08,831 h60
  text "NC" at 2845.59,819 h60
  text "#" at 1891.67,818 h60 r270
  text "#" at 2191.33,789 h60 r90
  text "VBAT" at 1668,753 h60 r90
  text "VCC#" at 1579,748 h60 r90
  text "12V" at 1769.04,748 h60 r90
  text "+" at 2845.59,719 h60
  text "#" at 264.33,627 h60 r90
  text "-" at 2845.59,617 h60
  text "#" at 2116,607.67 h60
  text "#" at 2718,576.33 h60 r180
  text "#" at 471,474.67 h60
  text "#" at 740.33,433 h60 r90
  text "+VE" at 2827,430.94 h60 r90
  text "#" at 1916,428.67 h60
  text "&" at 259,216 h60
  text "-" at 150,183.41 h60 r270
  text "+" at 252,183.41 h60 r270
  text "BATTERY" at 2780,127.65 h60 r90
  text "-VE" at 2827,127.65 h60 r90
  text "BATTERY" at 2469,92 h40
  text "MONITORING" at 2469,56 h40
  text "NC" at 404,54.59 h60 r90
  text "NO" at 507,54.59 h60 r90
  text "COM" at 600,54.59 h60 r90
  text "CHARGING PORT" at 1590,54 h40
  text "#" at 896,-27.33 h60
Bottom Overlay:
  drawing of 3075 lines, arcs and shapes, not listed
  text "ZERO CARBON FOOTPRINT" at 1866.5,963.88 h38
  text "NOTE:" at 356.87,166 h60
  text "# >> 0.1uF 0603" at 356.34,114.15 h60
  text "& >> 10K 0603" at 356.34,62 h60
Board Outline:
  the board outline again, w10
Fabrication:
  drawing of 191 lines, arcs and shapes, not listed
  text "Layer" at 3202.74,2399.06 h60
  text "Name" at 3612.65,2399.06 h60
  text "Material" at 4542.4,2399.06 h60
  text "Thickness" at 5402.17,2399.06 h60
  text "Constant" at 6052,2399.06 h60
  text "Board Layer Stack" at 6621.86,2399.06 h60
  text "Top Overlay" at 3612.65,2279.06 h60
  text "Top Solder" at 3612.65,2159.06 h60
  text "Solder Resist" at 4542.4,2159.06 h60
  text "3.00mil" at 5402.17,2159.06 h60
  text "3.5" at 6052,2159.06 h60
  text "1" at 3202.74,2039.06 h60
  text "Top Layer" at 3612.65,2039.06 h60
  text "10.00mil" at 5402.17,2039.06 h60
  text "Dielectric 1" at 3612.65,1919.06 h60
  text "FR-4" at 4542.4,1919.06 h60
  text "37.00mil" at 5402.17,1919.06 h60
  text "4.8" at 6052,1919.06 h60
  text "2" at 3202.74,1799.06 h60
  text "Bottom Layer" at 3612.65,1799.06 h60
  text "10.00mil" at 5402.17,1799.06 h60
  text "Bottom Solder" at 3612.65,1679.06 h60
  text "Solder Resist" at 4542.4,1679.06 h60
  text "3.00mil" at 5402.17,1679.06 h60
  text "3.5" at 6052,1679.06 h60
  text "Bottom Overlay" at 3612.65,1559.06 h60
  text "Total board thickness:" at 3202.74,1439.06 h60
  text "63.00mil" at 5402.17,1439.06 h60
Drill Drawing:
  circle w10: c39.02,3904.33 r33.33
  lines w10: 5.69,2971 72.36,2971 72.36,3037.67 5.69,3037.67 5.69,2971 ; 5.69,3137.67 22.36,3137.67 22.36,3121 55.69,3121 55.69,3137.67 72.36,3137.67 72.36,3171 55.69,3171 55.69,3187.67 22.36,3187.67 22.36,3171 5.69,3171 5.69,3137.67 ; 5.69,3271 39.02,3287.67 72.36,3271 55.69,3304.33 72.36,3337.67 39.02,3321 5.69,3337.67 22.36,3304.33 5.69,3271 ; 5.69,3421 5.69,3437.67 22.36,3454.33 5.69,3471 5.69,3487.67 22.36,3487.67 39.02,3471 55.69,3487.67 72.36,3487.67 72.36,3471 55.69,3454.33 72.36,3437.67 72.36,3421 55.69,3421 39.02,3437.67 22.36,3421 5.69,3421 ; 5.69,3587.67 22.36,3587.67 39.02,3571 55.69,3587.67 72.36,3587.67 55.69,3604.33 72.36,3621 55.69,3621 39.02,3637.67 22.36,3621 5.69,3621 22.36,3604.33 5.69,3587.67 ; 5.69,3787.67 72.36,3787.67 39.02,3721 5.69,3787.67
  lines w15: -54.1,2926 11026.8,2926 ; -54.1,3976 11026.8,3976 ; 496.77,2776 496.77,4126 ; 1096.62,2776 1096.62,4126 ; 2196.3,2776 2196.3,4126 ; 2702.17,2776 2702.17,4126 ; 3435.97,2776 3435.97,4126 ; 4935.52,2776 4935.52,4126 ; 5525.37,2776 5525.37,4126 ; 6271.17,2776 6271.17,4126 ; 7460.82,2776 7460.82,4126 ; 8314.58,2776 8314.58,4126 ; 9648.19,2776 9648.19,4126 ; -54.1,2776 11026.8,2776 11026.8,4126 -54.1,4126 -54.1,2776
  text "Symbol" at 35.9,4021 h72
  text "Count" at 541.77,4021 h72
  text "Hole Size" at 1141.62,4021 h72
  text "Plated" at 2241.3,4021 h72
  text "Hole Type" at 2747.17,4021 h72
  text "Drill Layer Pair" at 3480.97,4021 h72
  text "Via/Pad" at 4980.52,4021 h72
  text "Pad Shape" at 5570.37,4021 h72
  text "Template" at 6316.17,4021 h72
  text "Description" at 7505.82,4021 h72
  text "Hole Tolerance (+)" at 8359.58,4021 h72
  text "Hole Tolerance (-)" at 9693.19,4021 h72
  text "1" at 541.77,3871 h60
  text "0.500mm (19.69mil)" at 1141.62,3871 h60
  text "PTH" at 2241.3,3871 h60
  text "Slot" at 2747.17,3871 h60
  text "Top Layer - Bottom Layer" at 3480.97,3871 h60
  text "Pad" at 4980.52,3871 h60
  text "Rounded" at 5570.37,3871 h60
  text "r220_110h50_160r100" at 6316.17,3871 h60
  text "2" at 541.77,3721 h60
  text "0.500mm (19.69mil)" at 1141.62,3721 h60
  text "PTH" at 2241.3,3721 h60
  text "Slot" at 2747.17,3721 h60
  text "Top Layer - Bottom Layer" at 3480.97,3721 h60
  text "Pad" at 4980.52,3721 h60
  text "Rounded" at 5570.37,3721 h60
  text "r180_110h50_120r100" at 6316.17,3721 h60
  text "2" at 541.77,3571 h60
  text "0.900mm (35.43mil)" at 1141.62,3571 h60
  text "PTH" at 2241.3,3571 h60
  text "Round" at 2747.17,3571 h60
  text "Top Layer - Bottom Layer" at 3480.97,3571 h60
  text "Pad" at 4980.52,3571 h60
  text "(Mixed)" at 5570.37,3571 h60
  text "(Mixed)" at 6316.17,3571 h60
  text "4" at 541.77,3421 h60
  text "2.000mm (78.74mil)" at 1141.62,3421 h60
  text "NPTH" at 2241.3,3421 h60
  text "Round" at 2747.17,3421 h60
  text "Top Layer - Bottom Layer" at 3480.97,3421 h60
  text "Pad" at 4980.52,3421 h60
  text "Rounded" at 5570.37,3421 h60
  text "c260hn200m265" at 6316.17,3421 h60
  text "6" at 541.77,3271 h60
  text "1.800mm (70.87mil)" at 1141.62,3271 h60
  text "PTH" at 2241.3,3271 h60
  text "Round" at 2747.17,3271 h60
  text "Top Layer - Bottom Layer" at 3480.97,3271 h60
  text "Pad" at 4980.52,3271 h60
  text "Rounded" at 5570.37,3271 h60
  text "c350h180" at 6316.17,3271 h60
  text "41" at 541.77,3121 h60
  text "1.000mm (39.37mil)" at 1141.62,3121 h60
  text "PTH" at 2241.3,3121 h60
  text "Round" at 2747.17,3121 h60
  text "Top Layer - Bottom Layer" at 3480.97,3121 h60
  text "Pad" at 4980.52,3121 h60
  text "(Mixed)" at 5570.37,3121 h60
  text "(Mixed)" at 6316.17,3121 h60
  text "568" at 541.77,2971 h60
  text "0.300mm (11.81mil)" at 1141.62,2971 h60
  text "PTH" at 2241.3,2971 h60
  text "Round" at 2747.17,2971 h60
  text "Top Layer - Bottom Layer" at 3480.97,2971 h60
  text "(Mixed)" at 4980.52,2971 h60
  text "Rounded" at 5570.37,2971 h60
  text "(Mixed)" at 6316.17,2971 h60
  text "624 Total" at 541.77,2821 h60
  text "Slot definitions :" at 35.9,2676.03 h60
  text "Routed Path Length" at 1068.59,2676.03 h60
  text "= Calculated from tool start centre position to tool end centre position." at 2171.25,2676.03 h60
  text "Hole Length" at 1068.59,2576.05 h60
  text "= Routed Path Length + Tool Size = Slot length as defined in the PCB layout" at 1761.39,2576.05 h60

## Dimensions
-59,2288 to -59,-60 on Dimension
-59,2288 to 3090.61,2288 on Dimension

## Text inside footprints (layer, text, board x,y; h text height)
J12: Top Overlay "PCB Edge" at 3070.73,189.91 h60 r90
J13: Top Overlay "PCB Edge" at 2798,2261.73 h60 r180